# Altium PCB PROC106B_ASCII.PcbDoc (part 7 of 8)
Units mil, origin at the board's own origin, x right, y up, seen from the top; angles counter-clockwise.
Board outline 4498.18 x 1060.53 mil, 8 copper layers (Top Layer, GND1, Sig1, PWR1, PWR2, Sig2, GND2, Bottom Layer), stack 69.602 mil thick; 439 components, 327 nets, 1548 pads, 843 vias.
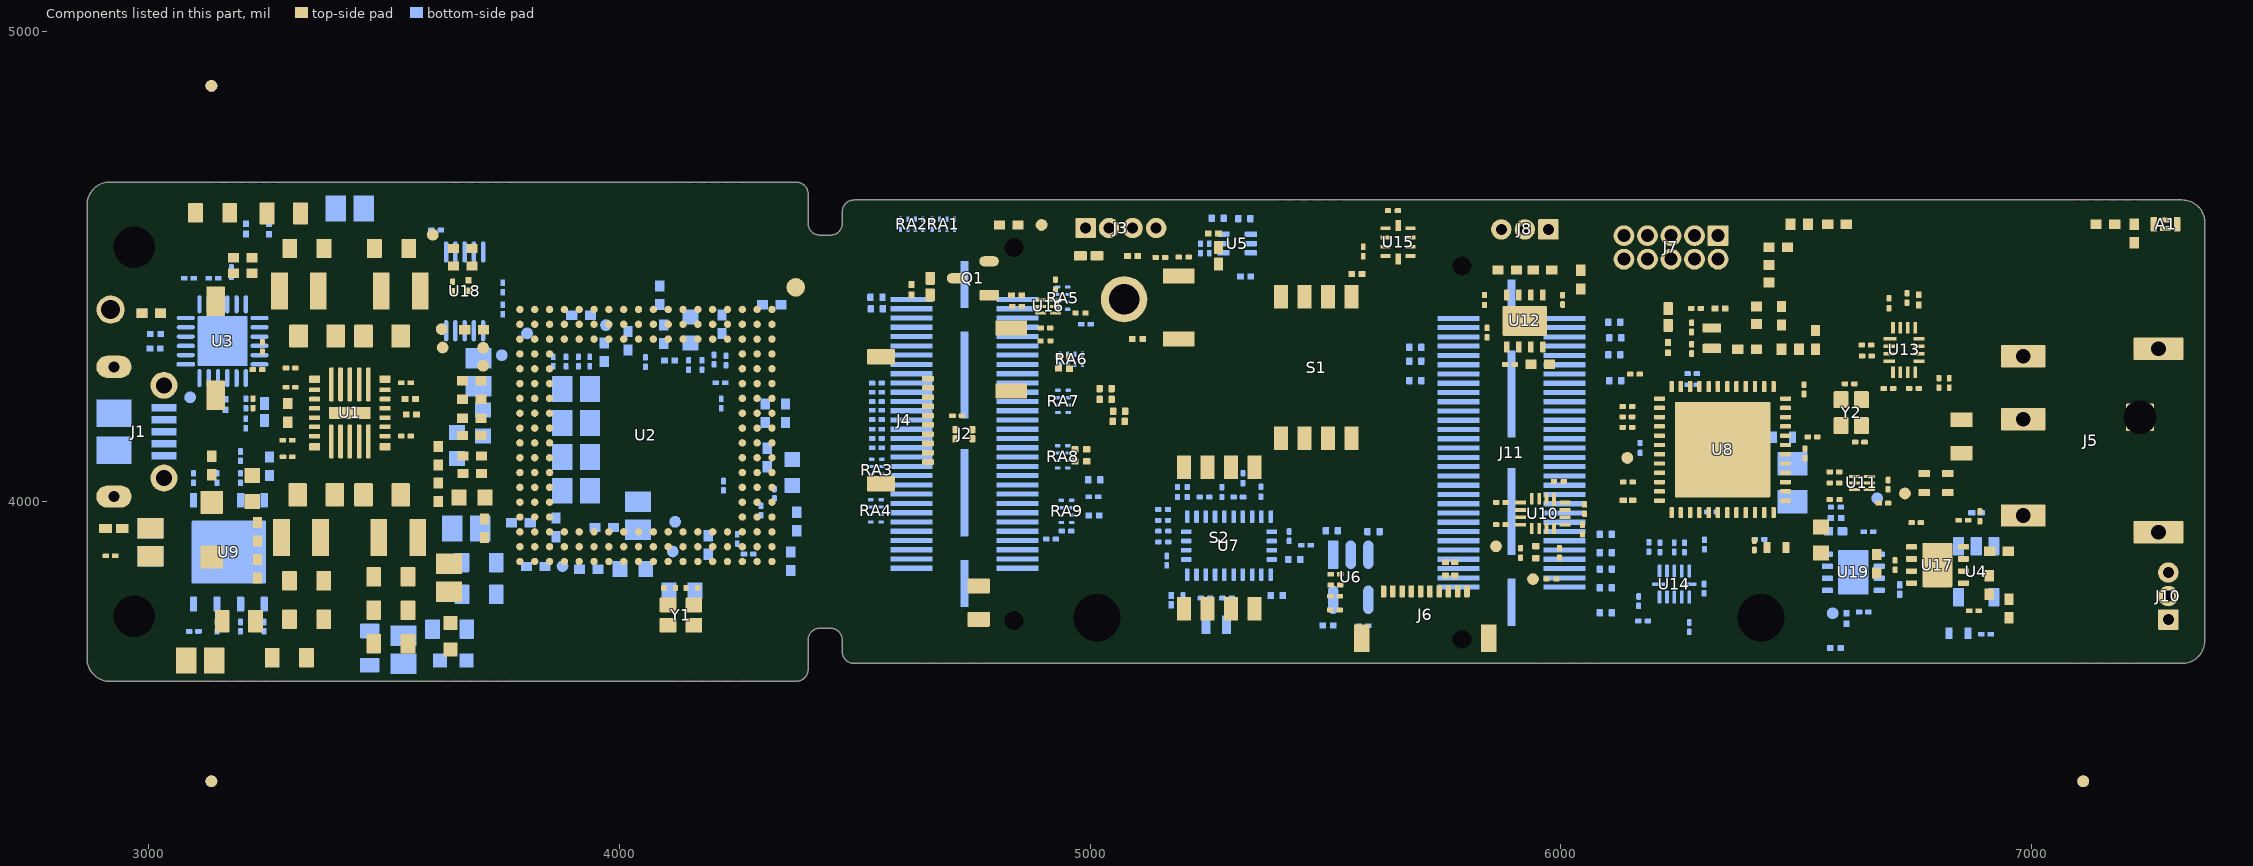
[diagram p13: the components of this part, seen from the top]

## Polygon pours and split planes (outlines as drawn) (continued)
GND on Bottom Layer "Bottom Layer-GND 3" (solid, remove dead copper, pour order 760): 3437.8,4669.84 3522.45,4669.84 3522.45,4586.72 3437.8,4586.72
GND on Bottom Layer "Bottom Layer-GND 5" (solid, remove dead copper, pour order 756): 3589.51,3885.19 3589.51,3816.34 3622.06,3783.79 3660.04,3745.8 3660.04,3708.73 3691.76,3708.73 3691.76,3893.86 3678.45,3907.17 3611.49,3907.17
GND on Bottom Layer "Bottom Layer-GND 2" (solid, remove dead copper, pour order 748): 3921.61,4124.36 3995.34,4124.36 3995.34,3981.19 3921.61,3981.19
AR_1P2 on Bottom Layer "Bottom Layer-AR_1P2" (solid, remove dead copper, pour order 742): 3283.69,4679.43 3417.05,4679.43 3417.05,4582.18 3283.69,4582.18
5V_IN on Bottom Layer "Bottom Layer-5V_IN" (solid, remove dead copper, pour order 721): 2969.58,3908.01 3085.96,3908.01 3085.96,3827.52 2969.58,3827.52
PMIC_1V0 on Bottom Layer "Bottom Layer-PMIC_1V0" (solid, remove dead copper, pour order 719): 3710.58,3701.2 3698.85,3689.47 3661.67,3689.47 3661.67,3629.17 3763.64,3629.17 3763.64,3701.2
no net on Bottom Layer "BOTTOM-No Net 1" (solid, remove dead copper, pour order 709): 3713.85,4118.01
no net on Bottom Layer "BOTTOM-No Net" (solid, pour order 707): 3795.02,4389.29
no net on Bottom Layer " " (solid, remove dead copper, pour order 705): 3587.57,4370.79
no net on Bottom Layer " " (solid, remove dead copper, pour order 703): 3587.57,4370.79
AR_1V8 on Bottom Layer "Bottom Layer-BB_1V8" (solid, remove dead copper, pour order 701): 3903.37,4272.45 3852.76,4272.45 3665,4272.45 3665,4219.16 3815.53,4219.16 3824.69,4210 3903.37,4210
AR_1V8 on Bottom Layer "BOTTOM-VCO_1V8" (solid, remove dead copper, pour order 697): 3975,3962.68 4012.22,3962.68 4071,3962.68 4071,3910.88 3975,3910.88
AR_1P0_RF1 on Bottom Layer "Bottom Layer-AR_1P0_RF1" (solid, remove dead copper, pour order 695): 3856.3,4159.48 3856.3,4197.12 3899.77,4197.12 3900.11,4131.96 3794.33,4131.96 3774.34,4131.96 3764.92,4122.55 3691.55,4122.54 3691.55,4159.48
AR_1V8 on Bottom Layer "BOTTOM-VCLK_1V8" (solid, remove dead copper, pour order 691): 3679.79,3911.04 3910.06,3911.04 3910.06,3943.24 3783.91,3943.24 3783.91,3983.65 3679.79,3983.65
no net on Bottom Layer "Bottom Layer-No Net" (solid, pour order 683): 3057.31,4083.94
PMIC_3V3 on Bottom Layer "Bottom Layer-PMIC_3V3" (solid, remove dead copper, pour order 681): 3004.01,4452.9 3113.51,4452.9 3113.51,4399.78 3109.47,4395.73 3102.51,4395.73 3097.94,4391.16 3097.94,4365.53 3051.98,4365.53 3033.61,4383.9 3004.01,4383.9
AR_1P0_RF1 on Bottom Layer "Bottom Layer-AR_1P0_RF1 1" (solid, remove dead copper, pour order 679): 3715.91,3777.88 3715.91,3726.32 3794.09,3726.32 3794.09,3828.85 3780.86,3842.09 3780.86,3896.41 3715.91,3896.41
5V_HD_IN on Bottom Layer "Bottom Layer-5V_HD_IN 1" (solid, pour order 557): 6641.93,3812.08 6641.93,3696.21 6707.53,3696.21 6707.53,3812.08 6702.57,3812.08 6659.82,3812.08 6662.84,3812.08
5V_HD_IN on Bottom Layer "Bottom Layer-5V_HD_IN 3" (solid, pour order 563): 4868.09,3859.51
5V_IN_B on Bottom Layer "Bottom Layer-5V_IN_B" (solid, pour order 521): 6653.01,3852.6 6759.98,3852.6 6759.98,4006.83 6775.86,4022.71 6798.1,4022.71 6798.1,4150.17 6690.11,4150.17 6690.11,4110.05 6690.85,4109.3 6690.85,4101.69 6690.85,4075.96 6690.86,4067.7 6655.23,4032.07 6655.23,3923.83 6657.56,3921.5 6658.81,3920.25 6675.91,3903.15 6685.85,3893.21 6685.75,3876.47 6681.98,3872.7 6653.01,3872.7
RE on Bottom Layer "Bottom Layer-RE" (solid, remove dead copper, pour order 505): 7331.54,4438.37 7307.92,4438.37 7307.92,4627.35 7331.54,4627.35
5V_IN on Bottom Layer "BOTTOM-5V_IN_SW" (solid, pour order 318): 6716.51,3843.31 6664.37,3843.31 6664.37,3827.48 6697.27,3827.48 6706.84,3817.91 6713.65,3817.91 6727.01,3817.91 6727.01,3728.16 6799.26,3728.16 6826.37,3755.28 6826.37,3800.18 6821.37,3805.18 6801.37,3805.18 6782.49,3805.18 6777.74,3809.92 6777.74,3842.18 6773.37,3846.18 6719.37,3846.18
no net on Bottom Layer " " (solid, remove dead copper, pour order 459): 4514.15,4464.37
no net on Bottom Layer "BOTTOM-No Net 3" (solid, pour order 266): 4918.91,3816.49
no net on Bottom Layer "BOTTOM-No Net 4" (solid, pour order 264): 4983.76,3878.78
AR_1P0_RF1 on PWR1 "PWR1-AR_1P0_RF1" (solid, remove dead copper, pour order 725): 3696.4,3846.98 3714.8,3828.66 3783.45,3828.66 3783.45,3726.14 3520.23,3726.14 3520.23,3982.24 3689.65,4151.66 3872.58,4151.66 3872.58,4038.59 3731.51,4038.59 3696.4,4003.44
AR_1P2 on PWR1 "PWR1-AR_1P2" (solid, remove dead copper, pour order 731): 4383.81,4173.3 4383.81,4319.42 4383.81,4679.43 3769.2,4679.43 3254.72,4679.43 3254.72,4485.55 3606.66,4485.55 3606.66,4349.35 3935.57,4349.35 3935.57,4419.55 4276.95,4419.55 4302.94,4393.56 4302.94,4179.48 4325.05,4157.06 4325.05,4115.19 4335.64,4104.6 4335.64,3889.16 4152.76,3889.16 4152.76,3822.45 4383.81,3822.45 4383.81,4093.23
AR_1V8 on PWR1 "PWR1-AR_1V8" (solid, remove dead copper, pour order 723): 4317.82,4156.75 4296.2,4178.37 4296.2,4372.39 4266.03,4403.13 3952.06,4403.13 3910.52,4361.6 3660.28,4361.6 3593.74,4295.06 3322.56,4294.82 3322.56,3824.21 3281.64,3783.2 3142.74,3783.2 3142.74,3618.01 3500.96,3618.01 3500.96,3997.33 3676.25,4172.62 3923.29,4172.62 3923.29,4273.48 4199.1,4273.48 4199.1,4021.86 4199.1,4020.83 4184.31,4005.54 3744.04,4005.54 3729.16,3990.66 3729.26,3874.14 3749.49,3853.9 3750.27,3853.73 3989.56,3853.73 4046.2,3910.37 4317.82,3910.37
PMIC_1V0 on PWR1 "PWR1-PMIC_1V0" (solid, remove dead copper, pour order 864): 3679.96,3619.99 3679.96,3702.53 3774.68,3702.53 3774.68,3619.99
5V_IN on PWR1 "PWR1-5V_IN 1" (solid, remove dead copper, pour order 804): 6141.87,4641.38 7225.46,4641.38 7225.46,4357.95 7367.49,4358.05 7367.49,3676.33 6736.31,3676.33 6736.31,3926.82 6479.48,4183.28 5319.35,4183.28 4687.15,4183.28 4621.42,4117.56 4621.33,3669.11 4525.19,3669.11 4484.07,3669.11 4484.07,3849.59 4504.63,3849.59 4525.19,3864.58 4525.19,4641.38 5562.04,4641.38
5V_HD_IN on PWR1 "PWR1-5V_HD_IN" (solid, remove dead copper, pour order 366): 4635.53,4107.41 4635.53,3657.14 4801.12,3657.14 6712,3657.14 6712,3928.7 6480.61,4160.09 4688.21,4160.09
GND on PWR1 "PWR1-GND" (solid, remove dead copper, pour order 820): 3962.57,4259.22 3962.51,4259.86 4180.36,4259.86 4180.36,4031.23 3955.54,4031.23 3955.54,4259.22
5V_IN on PWR1 "PWR1-5V_IN" (solid, remove dead copper, pour order 734): 3300,3843.45 3252.31,3795.76 3252.31,3795.43 3073.61,3795.43 3073.61,3588.77 2869.58,3588.77 2869.58,4710.9 3245.35,4710.9 3245.35,4475.15 3587.25,4475.15 3587.25,4312.5 3300,4312.5
no net on PWR1 "L4 PWR/GND-No Net" (solid, pour order 380): 3990.62,4017.94
GND on Sig1 "      " (solid, remove dead copper, pour order 850): 2828.55,3502.51 4359.83,3502.51 4359.83,3540.49 7326.73,3540.49 7326.73,4241.62 7189.18,4241.62 7189.18,4455.67 7189.2,4491.21 7189.18,4525 4359.83,4525 4359.83,4563.04 2828.55,4563.04
GND on Sig1 "      " (solid, pour order 848): 7230.23,4607.59
3V0 on Sig1 "Sig1-3V0" (solid, remove dead copper, pour order 422): 5446.44,3648.08 5446.44,3740.77 5595.34,3889.68 5748.5,3889.68 5802.08,3836.09 5802.08,3784.14 5860.53,3725.69 6169.64,3725.69 6235.53,3789.89 6235.53,3854.82 6235.53,3991.13 6627.54,3991.13 6738.96,3879.71 6738.96,3854.82 6817.4,3854.82 6844.28,3827.94 6844.28,3688.85 6676.2,3688.85 6676.2,3872.61 6372.91,3872.61 6372.91,3648.08
no net on Sig1 "Sig1-No Net" (solid, remove dead copper, pour order 740): 4088.43,4371.99
no net on Sig1 "L3 SIG 1-No Net" (solid, pour order 511): 3904.98,4012.92
GND on GND1 "GND1-GND" (solid, remove dead copper, pour order 358): 4400.86,4641.38 4400.86,4683.33 2896.63,4683.34 2866.42,4653.12 2866.42,3646.93 2901.93,3611.42 2908,3617.49 4400.86,3617.49 4400.86,3656.87 7367.49,3656.87 7367.49,4358 7230.09,4358 7230.25,4641.38
no net on GND1 "L6 SIG 2-No Net" (solid, pour order 302): 4825.92,3926.28
no net on GND1 "DVDD_21MP_1V8_L08_P-001" (solid, remove dead copper, pour order 300): 3885.7,4301.32
PMIC_3V3 on PWR2 "PWR2-PMIC_3V3" (solid, remove dead copper, pour order 487): 4615.73,4308.97 4816.08,4509.31 4816.08,4512.23 4816.08,4631.43 4498.89,4631.43 4400.86,4631.43 4400.86,4710.69 2869.58,4710.9 2869.58,3586.35 4376.76,3586.35 4376.76,3820.05 4376.76,4308.97 4415.39,4308.97
VCC_BA_3V3 on PWR2 "PWR2-VCC_BA_3V3" (solid, remove dead copper, pour order 738): 4794.48,4263.72 4759.59,4298.61 4759.59,4414.21 4838.48,4493.1 4838.48,4641.38 7229.32,4641.38 7229.31,4358 7367.49,4358 7367.49,3657.14 4794.48,3657.14
5V_IN on PWR2 " " (solid, remove dead copper, pour order 485): 3880.16,4286.09 3848.77,4254.7 3706.1,4254.7 3706.1,4223.31 3664.77,4181.97 3492.6,4181.97 3492.6,4313.97 3583.8,4313.97 3584.11,4493.43 3259.65,4493.43 3259.65,3889.51 4016.31,3889.51 4108.84,3982.04 4306.6,3982.03 4322,3966.64 4322,3920.77 4353.26,3889.51 4413.43,3889.51 4439.46,3863.48 4453.67,3863 4483.91,3863 4485.31,3861.61 4485.31,3661.8 4490.12,3656.98 4514.15,3656.87 4748.59,3656.87 4748.59,3887.85 4748.59,4286.09
VDDS on PWR2 "PWR2-VDDS" (solid, remove dead copper, pour order 404): 6492.17,3939.96 6492.17,4039.29 6539.41,4086.52 6582.96,4086.52 6582.96,4179.9 6582.31,4179.25 6460.14,4179.25 6427.22,4212.17 6283.81,4212.17 6200.92,4295.06 6134.69,4295.06 6134.69,4010.53 6208.12,3939.96
no net on PWR2 " " (solid, remove dead copper, pour order 406): 3419.66,3877.85
no net on Bottom Solder (solid): 4400.86,4518.08 3736.09,4518.08 3736.09,4678.67 4400.86,4678.67
no net on Bottom Solder (solid): 3815.62,3618.33 3815.62,3780.33 4400.86,3780.33 4400.86,3634.41 4384.78,3618.33
no net on Bottom Solder (solid): 4189.03,4266.74 4189.03,4031.3 4008.5,4031.3 4008.5,4266.74
no net on Bottom Solder " " (solid, remove dead copper): 4514.15,4464.37
no net on Bottom Solder " " (solid, remove dead copper): 4512,4464.37
no net on M1 Board Outline " " (solid, remove dead copper): 3143.52,4361.87
no net on M1 Board Outline " " (solid, remove dead copper): 3145.55,4361.06
no net on Top Paste " " (solid): 4029.26,4016.78 3910.77,4016.78 3910.77,4130.21 4029.26,4130.21
no net on Top Paste " " (solid): 4169.12,4155.98 4050.63,4155.98 4050.63,4269.41 4169.12,4269.41
no net on Top Paste " " (solid): 4169.12,4016.78 4050.63,4016.78 4050.63,4130.21 4169.12,4130.21
no net on Top Paste " " (solid): 4029.26,4155.98 3910.77,4155.98 3910.77,4269.41 4029.26,4269.41
no net on Top Solder " " (solid): 4169.12,4016.78 4050.63,4016.78 4050.63,4130.21 4169.12,4130.21
no net on Top Solder " " (solid): 4169.12,4155.98 4050.63,4155.98 4050.63,4269.41 4169.12,4269.41
no net on Top Solder " " (solid): 4029.26,4016.78 3910.77,4016.78 3910.77,4130.21 4029.26,4130.21
no net on Top Solder " " (solid): 4029.26,4155.98 3910.77,4155.98 3910.77,4269.41 4029.26,4269.41
GND on GND2 "GND 3-GND" (solid, remove dead copper, pour order 310): 4438.86,3618.9 7367.49,3614.6 7367.49,4358 7230.24,4358 7230.24,4686.41 4522.77,4686.41 2869.56,4686.41 2869.85,3618.9
GND on Sig2 "      " (solid, remove dead copper, pour order 854): 2869.58,3618.9 4400.86,3618.9 4400.86,3656.87 4400.86,3731.52 4473.63,3731.52 4473.63,3657.18 4474.07,3656.87 7367.49,3656.87 7367.49,4358 7228.97,4358 7228.97,4572.06 7228.97,4607.59 7228.97,4641.38 4400.86,4641.38 4400.86,4679.43 2869.58,4679.43

## Keep-outs
Bottom Layer:
  rectangle: 3813.97,3824.21 4076.76,3834.25
Keep-Out Layer:
  circle w1: c5014.62,3754.06 r118.11
  circle w1: c6425.96,3754.06 r118.11
  text ".Layer_Name" at 577,-858.49 h60

## Other copper
Top Layer:
  text ".Layer_Name" at 577,-858.49 h60
GND1:
  text ".Layer_Name" at 577,-858.49 h60
Sig1:
  text ".Layer_Name" at 577,-858.49 h60
PWR1:
  text ".Layer_Name" at 577,-858.49 h60
PWR2:
  text ".Layer_Name" at 577,-858.49 h60
Sig2:
  text ".Layer_Name" at 577,-858.49 h60
GND2:
  text ".Layer_Name" at 577,-858.49 h60
Bottom Layer:
  text ".Layer_Name" at 577,-858.49 h60

## Silkscreen, mask and mechanical layers (free items; w line width, h text height)
Top Overlay:
  drawing of 931 lines, arcs and shapes, not listed
  text "ANT" at 7247.11,4618.46 h15
  text "3V3" at 4971.03,4609.77 h15
  text "SCL" at 5026.44,4609.1 h15
  text "SDA" at 5075.13,4609.42 h15
  text "GND" at 5132,4609 h15
  text "CAN1" at 5705.55,4605.09 h15
  text "3V3" at 3575.93,4600.61 h15
  text "CAN_L" at 6013.93,4563.4 h15
  text "CAN_H" at 5772.29,4557.35 h15
  text "GND" at 5902.73,4526.81 h15
  text "60PIN" at 5461.3,4505.87 h15 r90
  text "60PIN/BT" at 5407.96,4487.66 h15 r90
  text "3V3" at 4942.95,4473.45 h15
  text "LED" at 4995.38,4473.19 h15
  text "BT_JTAG_HDR" at 6201.8,4466.71 h15
  text "USR_LED" at 5256.55,4450.34 h13
  text "PROC106B" at 6836.63,4404.24 h25
  text "RST_LED" at 4614,4391 h15
  text "REV. B" at 6899.9,4369.83 h25
  text "GND" at 5054.02,4359.61 h15
  text "GND" at 2907.55,4353.02 h15
  text "BT_LED" at 6186.99,4348.24 h15 r90
  text "S3" at 3013.35,4323.17 h25
  text "USR_SW" at 5152.14,4301.5 h15
  text "SOP2" at 2999.29,4296.66 h15
  text "RST_SW" at 4794.22,4190.93 h15
  text "CAN" at 5202.96,4125.61 h15 r90
  text "60PIN" at 5257.16,4116.94 h15 r90
  text "BT_EN" at 5300.52,4106.1 h15 r90
  text "PROC106B" at 2866.22,4100.51 h25
  text "REV. B" at 2897.63,4071.86 h25
  text "BT" at 5464.69,4051.28 h15 r90
  text "SOP0" at 5511.87,4024.99 h15 r90
  text "SOP1" at 5563.64,4022.15 h15 r90
  text "CP2105" at 5431.33,4007.09 h15 r90
  text "5V_LED" at 2974.55,3984.77 h15
  text "LCD_DISP2" at 4737,3978 h15 r90
  text "5V, 2A" at 7023.94,3880.64 h25
  text "CAN_H" at 7195.3,3876.22 h15
  text "LCD_DISP1" at 5564.31,3865.44 h15
  text "GND" at 7243.19,3786.08 h15 r90
  text "CAN2" at 7119,3761 h25
  text "CAN_L" at 7189,3721 h15
  text "BT_DIS" at 5331.39,3700.83 h15
  text "BT/LCD" at 5214.43,3697.87 h15
  text "SPI" at 5198.89,3696.39 h15 r90
  text ".Layer_Name" at 557.88,-855.15 h60
Bottom Overlay:
  lines w6: 3076.75,4275.09 3064.53,4275.09 3077.44,4262.17 3077.44,4274.39 ; 3742.27,4351.32 3750.91,4342.68 3750.91,4360.94 3742.27,4352.3 ; 4566.51,3859.44 4557.87,3850.8 4557.87,3869.06 4566.51,3860.42 ; 5190.34,3835.05 5178.12,3835.05 5191.04,3822.14 5191.04,3834.36 ; 5366.68,4568.32 5375.32,4559.68 5375.32,4577.94 5366.68,4569.3 ; 5498.49,3885.48 5489.85,3876.84 5489.85,3895.1 5498.49,3886.46 ; 6061.18,4387.35 6069.82,4378.71 6069.82,4396.98 6061.18,4388.34 ; 6286.44,3772.48 6277.8,3763.84 6296.07,3763.84 6287.43,3772.48 ; 6545.92,3811.92 6537.28,3803.28 6537.28,3821.55 6545.92,3812.91 ; 6822.27,3908.34 6813.62,3899.69 6813.62,3917.96 6822.27,3909.32
  lines w7.64: 3376.95,4259.36 3435.38,4360.56 3493.81,4259.36 3376.95,4259.36
  text "S/N:" at 7054.26,4555.33 h40
  text "J11" at 5720.69,4441.63 h25
  text "OPN:" at 7053.04,4398.05 h40
  text "For evaluation only;" at 6904.33,4270.31 h30
  text "not FCC approved for resale." at 6905.33,4220.31 h30
  text "USB_LED" at 3294.77,4133.76 h15 r270
  text "ICBOOST_CONN" at 5046.93,4070.06 h25 r270
  text "DCA_CONN" at 5658.79,4014.25 h25 r270
  text "USB1" at 2938.13,3956.53 h15
  text "U14" at 6365,3859 h25
  text ".Layer_Name" at 577,-858.49 h60
Top Paste:
  text ".Layer_Name" at 577,-858.49 h60
Bottom Paste:
  text ".Layer_Name" at 577,-858.49 h60
Top Solder:
  text ".Layer_Name" at 577,-858.49 h60
  text ".Layer_Name" at 577,-858.49 h60
Bottom Solder:
  text ".Layer_Name" at 577,-858.49 h60
Drill Guide:
  text ".Layer_Name" at 577,-858.49 h60
M1 Board Outline:
  lines w1: 2917.58,3586.87 2917.58,3586.87
  lines w6: 3043.52,4771.95 2893.99,4771.95 ; 4408.74,4993.07 7334.57,4993.07 ; 5242.82,4819.03 cw(c5242.82,4776.51) 5285.34,4776.51 ccw(c5327.85,4776.51) 5327.85,4734 5349.85,4734 ; 5242.82,4819.16 4924.89,4819.16 ccw(c4924.89,4776.65) 4882.38,4776.65 cw(c4839.86,4776.65) 4839.86,4734.13 4405.8,4734.13 cw(c4405.8,4743.59) 4396.34,4743.59 4396.34,4758.92 ccw(c4383.31,4758.92) 4383.31,4771.95 2893.99,4771.95 ; 5631,4734 5670.37,4734 ccw(c5670.37,4776.51) 5712.88,4776.51 cw(c5755.4,4776.51) 5755.4,4819.03 cw(c5755.57,4819.03) 5755.57,4819.2 6393.01,4819.2 cw(c6393.01,4776.68) 6435.53,4776.68 ccw(c6478.04,4776.68) 6478.04,4734.17 ; 6478.04,4733.95 7319.76,4733.95 ccw(c7319.57,4733.95) 7319.57,4734.13 7320.05,4734.13 ; 6824.41,4993.07 2895.02,4993.07 ccw(c2895.02,4967.63) 2869.59,4967.63 2869.59,4796.35 ccw(c2893.99,4796.35) 2893.99,4771.95 ; 7317.76,4993.07 cw(c7317.76,4943.07) 7367.76,4943.07 7367.76,4781.58 cw(c7320.31,4781.58) 7320.31,4734.13 ; 7320.59,3563.53 4607.03,3563.53 4428.96,3563.53 ccw(c4428.96,3550.55) 4415.97,3550.55 4415.97,3537.53 cw(c4404.81,3537.53) 4404.81,3526.38 3043.52,3526.38 2923.72,3526.38 2907.56,3526.38 ccw(c2907.56,3488.4) 2869.58,3488.4 2869.58,3349.31 ccw(c2912.09,3349.31) 2912.09,3306.8 6841.48,3306.8 7329.95,3306.8 ccw(c7329.95,3343.5) 7366.66,3343.5 ; 7321.69,3563.53 cw(c7321.69,3517.44) 7367.79,3517.44 ; 7367.76,3343.5 7367.76,3517.41
  lines w10: 2869.58,3666.9 ccw(c2917.58,3666.9) 2917.58,3618.9 ; 2869.58,3666.9 ccw(c2917.58,3666.9) 2917.58,3618.9 ; 2869.58,3666.9 2869.58,4631.43 ; 2869.58,3666.9 2869.58,4631.43 ; 2869.58,4631.43 cw(c2917.58,4631.43) 2917.58,4679.43 ; 2869.58,4631.43 cw(c2917.58,4631.43) 2917.58,4679.43 ; 2917.58,3618.9 4375.86,3618.9 2917.58,3618.9 ; 2917.58,4679.43 4375.28,4679.43 2917.58,4679.43 ; 4400.86,3644 cw(c4375.86,3644) 4375.86,3619 ccw(c4375.86,3644) 4400.86,3644 ; 4400.86,3644 4400.86,3706.52 ; 4400.86,3644 4400.86,3706.52 ; 4400.86,3706.52 cw(c4425.86,3706.52) 4425.86,3731.52 ; 4400.86,3706.52 cw(c4425.86,3706.52) 4425.86,3731.52 ; 4400.86,3876.17 ccw(c4425.86,3876.17) 4425.86,3851.17 ; 4400.86,3876.17 ccw(c4425.86,3876.17) 4425.86,3851.17 ; 4400.86,3876.17 4400.86,3900.82 ; 4400.86,3876.17 4400.86,3900.82 ; 4400.86,3900.82 cw(c4425.86,3900.82) 4425.86,3925.82 ; 4400.86,3900.82 cw(c4425.86,3900.82) 4425.86,3925.82 ; 4400.86,4136.81 ccw(c4425.86,4136.81) 4425.86,4111.81 ; 4400.86,4136.81 ccw(c4425.86,4136.81) 4425.86,4111.81 ; 4400.86,4136.81 4400.86,4161.47 ; 4400.86,4136.81 4400.86,4161.47 ; 4400.86,4161.47 cw(c4425.86,4161.47) 4425.86,4186.47 ; 4400.86,4161.47 cw(c4425.86,4161.47) 4425.86,4186.47 ; 4400.86,4397.47 ccw(c4425.86,4397.47) 4425.86,4372.47 ; 4400.86,4397.47 ccw(c4425.86,4397.47) 4425.86,4372.47 ; 4400.86,4397.47 4400.86,4422.12 ; 4400.86,4397.47 4400.86,4422.12 ; 4400.86,4422.12 cw(c4425.86,4422.12) 4425.86,4447.12 ; 4400.86,4422.12 cw(c4425.86,4422.12) 4425.86,4447.12 ; 4400.86,4591.77 ccw(c4425.86,4591.77) 4425.86,4566.77 ; 4400.86,4591.77 ccw(c4425.86,4591.77) 4425.86,4566.77 ; 4400.86,4591.77 4400.86,4654.3 ; 4400.86,4591.77 4400.86,4654.3 ; 4400.86,4654.3 ccw(c4375.86,4654.3) 4375.86,4679.3 cw(c4375.86,4654.3) 4400.86,4654.3 ; 4425.86,3731.52 4448.63,3731.52 ; 4425.86,3731.52 4448.63,3731.52 ; 4425.86,3851.17 4448.63,3851.17 ; 4425.86,3851.17 4448.63,3851.17 ; 4425.86,3925.82 4448.63,3925.82 ; 4425.86,3925.82 4448.63,3925.82 ; 4425.86,4111.81 4448.63,4111.81 ; 4425.86,4111.81 4448.63,4111.81 ; 4425.86,4186.47 4448.63,4186.47 ; 4425.86,4186.47 4448.63,4186.47 ; 4425.86,4372.47 4448.63,4372.47 ; 4425.86,4372.47 4448.63,4372.47 ; 4425.86,4447.12 4448.63,4447.12 ; 4425.86,4447.12 4448.63,4447.12 ; 4425.86,4566.77 4448.63,4566.77 ; 4425.86,4566.77 4448.63,4566.77 ; 4448.63,3731.52 cw(c4448.63,3706.52) 4473.63,3706.52 ; 4448.63,3731.52 cw(c4448.63,3706.52) 4473.63,3706.52 ; 4448.63,3851.17 ccw(c4448.63,3876.17) 4473.63,3876.17 ; 4448.63,3851.17 ccw(c4448.63,3876.17) 4473.63,3876.17 ; 4448.63,3925.82 cw(c4448.63,3900.82) 4473.63,3900.82 ; 4448.63,3925.82 cw(c4448.63,3900.82) 4473.63,3900.82 ; 4448.63,4111.81 ccw(c4448.63,4136.81) 4473.63,4136.81 ; 4448.63,4111.81 ccw(c4448.63,4136.81) 4473.63,4136.81 ; 4448.63,4186.47 cw(c4448.63,4161.47) 4473.63,4161.47 ; 4448.63,4186.47 cw(c4448.63,4161.47) 4473.63,4161.47 ; 4448.63,4372.47 ccw(c4448.63,4397.47) 4473.63,4397.47 ; 4448.63,4372.47 ccw(c4448.63,4397.47) 4473.63,4397.47 ; 4448.63,4447.12 cw(c4448.63,4422.12) 4473.63,4422.12 ; 4448.63,4447.12 cw(c4448.63,4422.12) 4473.63,4422.12 ; 4448.63,4566.77 ccw(c4448.63,4591.77) 4473.63,4591.77 ; 4448.63,4566.77 ccw(c4448.63,4591.77) 4473.63,4591.77 ; 4473.47,4616.39 cw(c4498.47,4616.39) 4498.47,4641.39 ccw(c4498.47,4616.39) 4473.47,4616.39 ; 4473.47,4616.39 4473.63,4591.77 ; 4473.47,4616.39 4473.63,4591.77 ; 4473.63,3706.52 4473.63,3681.91 4473.63,3706.52 ; 4473.63,3876.17 4473.63,3900.82 ; 4473.63,3876.17 4473.63,3900.82 ; 4473.63,4136.81 4473.63,4161.47 ; 4473.63,4136.81 4473.63,4161.47 ; 4473.63,4397.47 4473.63,4422.12 ; 4473.63,4397.47 4473.63,4422.12 ; 7319.76,4641.43 cw(c7319.76,4593.44) 7367.75,4593.44 ; 7319.76,4641.43 cw(c7319.76,4593.44) 7367.75,4593.44 ; 7319.76,4641.43 4498.47,4641.43 7319.76,4641.43 ; 7367.76,3704.87 cw(c7319.76,3704.87) 7319.76,3656.87 ccw(c7319.76,3704.87) 7367.76,3704.87 ; 7367.76,3704.87 7367.76,4593.44 ; 7367.76,3704.87 7367.76,4593.44 ; 7367.75,4593.44 7367.76,4593.44 ; 7367.75,4593.44 7367.76,4593.44 ; 4473.47,3681.91 ccw(c4498.47,3681.91) 4498.47,3656.91 cw(c4498.47,3681.91) 4473.47,3681.91 ; 4498.47,3656.87 7319.49,3656.87 4498.47,3656.87
  text "M1 Board Outline" at 577,-858.49 h60
M2 Board Dimensions:
  text "X3" at 4305,3996 h60 r90
  text "X3" at 4837,3440 h60
  text "M2 Board Dimensions" at 577,-858.49 h60
M3 3D STEP Top:
  text ".Layer_Name" at 577,-858.49 h60
M4 3D STEP Bottom:
  text ".Layer_Name" at 577,-858.49 h60
M5 Assembly Top:
  lines w2: 3900.18,4006.48 3900.18,4279.71 4179.71,4279.71 4179.71,4006.48 3900.18,4006.48
  lines w6: 3737.37,3862.55 3745.19,3854.73 3745.92,3854.73 ; 3745.92,4221.46 3745.92,3854.73 ; 3752.8,3861.61 3745.92,3854.73 ; 4662.01,4263.83 4670.65,4255.19 4670.65,4273.46 4662.01,4264.82 4662.01,4263.83 ; 4783.42,4428.97 4783.42,4429.96 4792.06,4438.6 4792.06,4420.33 4783.42,4428.97 ; 4938.22,4398.63 4938.22,4399.62 4946.86,4408.26 4946.86,4389.99 4938.22,4398.63 ; 5551.38,3777.7 5560.02,3786.34 5560.02,3787.32 5551.38,3795.97 5551.38,3777.7 ; 5966.42,4578.64 5975.06,4587.28 5976.04,4587.28 5984.68,4578.64 5966.42,4578.64 ; 6328.53,4574.58 6337.17,4583.22 6338.16,4583.22 6346.8,4574.58 6328.53,4574.58 ; 7291.94,3711.22 7291.94,3729.48 7300.58,3720.84 7300.58,3719.86 7291.94,3711.22
  lines w10: -287.5,-917.17 6312.5,-917.17 ; -287.5,-713.83 6314.5,-713.83 ; -287.5,-510.5 -287.5,-1120.5 3717.5,-1120.5 6314.5,-1120.5 6314.5,-510.5 -287,-510.5 -287,-1120.5 1288.5,-1120.5 ; 2177.5,-1120.5 2177.5,-510.5 ; 3444.5,-713.83 3444.5,-510.5 ; 4284.5,-713.83 4284.5,-510.5 ; 4906.5,-1127 4906.5,-924.17
  text "COMPONENTS MARKED 'DNP' SHOULD NOT BE POPULATED." at -159.85,-299.74 h60
  text "ASSEMBLY VARIANT:" at -160.35,-415.24 h60
  text ".VariantName" at 875.65,-415.24 h60
  text "PCB VIEWED FROM TOP SIDE" at -228.5,-655.67 h60
  text "BOARD #:" at 2248,-655.67 h60
  text ".PRJ_Number" at 2793.5,-655.67 h60
  text "REV:" at 3638,-655.67 h60
  text ".PCB_Rev" at 3929.5,-655.67 h60
  text "SVN REV:" at 4476,-655.67 h60
  text ".VersionControl_RevNumber" at 4982,-655.67 h60
  text ".Layer_Name" at 538.89,-854.26 h60
  text "TID #:" at 2248,-859 h60
  text ".TID" at 2793.5,-859 h60
  text "PLOT NAME =" at -228.5,-1064.34 h60
  text ".plot_File_Name" at 577,-1064.34 h60
  text "GENERATED    :" at 2250,-1064.34 h60
  text ".Print_Date" at 3119.5,-1064.34 h60
  text ".Print_Time" at 3848.5,-1064.34 h60
  text "TEXAS INSTRUMENTS" at 5113,-1064.34 h60
M6 Assembly Bottom:
  lines w6: 3051.59,4095.56 3060.23,4086.92 3060.23,4105.18 3051.59,4096.54 ; 3056.52,4289.78 3047.88,4281.14 3047.88,4299.4 3056.52,4290.76 ; 4556.9,3856.76 4548.26,3848.12 4548.26,3866.39 4556.9,3857.74 ; 6054.41,4389.59 6063.05,4380.95 6063.05,4399.22 6054.41,4390.57
  lines w10: -288,-714.33 6314,-714.33 ; -286,-917.67 6314,-917.67 ; 1120,-1127.5 1120,-924.67 ; 1742,-714.33 1742,-511 ; 2582,-714.33 2582,-511 ; 3849,-1121 3849,-511 ; 4510.26,4292.38 4510.26,4160.86 ; 4518.19,4168.91 4510.26,4160.98 4510.26,4160.86 ; 4738,-1121 6313.5,-1121 6313.5,-511 -288,-511 -288,-1121 2309,-1121 6314,-1121 6314,-511 ; 4510.26,4160.86 4501.64,4169.48 4510.26,4160.86
  text "COMPONENTS MARKED 'DNP' SHOULD NOT BE POPULATED." at 6102,-318 h60
  text ".VariantName" at 5058,-434 h60
  text "ASSEMBLY VARIANT:" at 6097,-434 h60
  text ".VersionControl_RevNumber" at 1035.5,-656.17 h60
  text "SVN REV:" at 1541.5,-656.17 h60
  text ".PCB_Rev" at 2088,-656.17 h60
  text "REV:" at 2379.5,-656.17 h60
  text ".PRJ_Number" at 3224,-656.17 h60
  text "BOARD #:" at 3769.5,-656.17 h60
  text "PCB VIEWED FROM BOTTOM SIDE" at 6246,-656.17 h60
  text ".Layer_Name" at 1514.22,-848.89 h60
  text ".TID" at 3224,-859.5 h60
  text "TID #:" at 3769.5,-859.5 h60
  text "TEXAS INSTRUMENTS" at 904.5,-1064.84 h60
  text ".Print_Time" at 2169,-1064.84 h60
  text ".Print_Date" at 2898,-1064.84 h60
  text "GENERATED    :" at 3767.5,-1064.84 h60
  text ".plot_File_Name" at 5440.5,-1064.84 h60
  text "PLOT NAME =" at 6246,-1064.84 h60
M10 Fab Notes:
  drawing of 254 lines, arcs and shapes, not listed
  text "2" at 3215,8061 h70
  text "1" at 739.84,8036.5 h70
  text "3" at 5724.84,8036.5 h70
  text "4" at 8231.51,8036.5 h70
  text "5" at 10730.5,8036.5 h70
  text "6" at 13235.5,8036.5 h70
  text "A" at -416.5,6893.5 h70
  text "A" at 14383.5,6893.5 h70
  text "DESIGN INFORMATION" at 12391.15,6364.21 h60
  text "4" at 12769.13,6238.04 h60
  text "MIN. TRACK WIDTH:" at 11746.59,6232.09 h60
  text "MIL" at 12997.59,6232.09 h60
  text "MIN. CLEARANCE:" at 11746.59,6107.96 h60
  text "4" at 12782.83,6107.96 h60
  text "MIL" at 12997.59,6107.96 h60
  text "MIN. VIA PAD SIZE:" at 11746.59,5983.83 h60
  text "18" at 12812.84,5983.84 h60
  text "MIL" at 12997.59,5983.83 h60
  text "0.05mm (2MIL)" at 12441.59,5853.93 h60
  text "MINIMUM ANNULAR RING" at 11417.36,5845.71 h60
  text "EXTERNAL" at 13149.59,5845.71 h60
  text "PER" at 11617.36,5735.58 h60
  text "IPC-D-275 CLASS 2 LEVEL C" at 11837.36,5735.58 h60
  text "MIL, HOLES" at 13325.59,5635.11 h60
  text "+/-" at 12933.13,5626.52 h60
  text "+/-" at 13787.13,5626.52 h60
  text "REGISTRATION TOLERANCES:" at 11417.36,5625.46 h60
  text "METAL" at 12617.13,5625.46 h60
  text "5" at 13193.33,5625.46 h60
  text "3" at 14026.33,5625.46 h60
  text "MIL" at 14142.59,5625.46 h60
  text "HOLE SIZE TOLERANCE (UNLESS OTHERWISE SPECIFIED):" at 11417.36,5527.14 h60
  text "+/-" at 13787.13,5524.27 h60
  text "3" at 14026.33,5523.21 h60
  text "MIL" at 14142.59,5523.2 h60
  text "MATERIAL:" at 11342.59,5385.56 h60
  text "FR-4 High Tg" at 12329.03,5257.03 h60
  text "X" at 12176.59,5254.04 h60
  text "FR-408" at 11763.59,5244.53 h60
  text "OTHER" at 13251.59,5244.53 h60
  text "74 MIL (1.86mm) +/-10%" at 12083.69,5101.5 h60
  text "X" at 11963.59,5099.04 h60
  text "THICKNESS:" at 11417.36,5093.27 h60
  text "OTHER" at 13368.59,5093.27 h60
  text "TOLERANCE:" at 11417.36,4954.96 h60
  text "X" at 12265.59,4954.96 h60
  text "ANSI IPC-6012 TYPE 3 CLASS 2" at 12443.6,4954.96 h60
  text "OTHER +/-" at 12443.59,4810.77 h60
  text "BOW & TWIST:" at 11417.36,4665.58 h60
  text "X" at 12265.59,4665.58 h60
  text "ANSI IPC-6012 TYPE 3 CLASS 2" at 12443.6,4665.58 h60
  text "OTHER +/-" at 12443.59,4518.89 h60
  text "B" at -416.5,4513.5 h70
  text "B" at 14383.5,4513.5 h70
  text "DRILLING:" at 11342.59,4388.27 h60
  text "NC_DRILL FILES" at 13103.59,4283.08 h60
  text "REFERENCE:" at 11417.36,4279.14 h60
  text "X" at 12074.59,4279.04 h60
  text "AS SHOWN" at 12252.59,4279.14 h60
  text "X" at 12975.59,4279.14 h60
  text "OTHER" at 13401.59,4136.89 h60
  text "PTH COPPER THICKNESS:" at 11417.03,4133.36 h60
  text "X" at 12556.27,4133.36 h60
  text "20-30 um" at 12684.27,4133.36 h60
  text "BOARD FINISH:" at 11342.59,3985.76 h60
  text "SILKSCREEN:" at 11497.81,3875.64 h60
  text "X" at 12455.59,3875.64 h60
  text "TOP" at 12572.59,3875.64 h60
  text "X" at 12965.59,3875.64 h60
  text "BOTTOM" at 13083.59,3875.64 h60
  text "SILKSCREEN COLOR:" at 11497.81,3720.45 h60
  text "X" at 12454.59,3720.45 h60
  text "WHITE" at 12572.59,3720.45 h60
  text "OTHER" at 13083.59,3720.45 h60
  text "X" at 12585.59,3577 h60
  text "RED" at 12703.59,3577 h60
  text "OTHER" at 13321.59,3577 h60
  text "SOLDER RESIST COLOR:" at 11497.81,3570.13 h60
  text "X" at 12585.59,3422.75 h60
  text "MATTE" at 12703.59,3422.75 h60
  text "SEMI-GLOSS" at 13321.13,3422.11 h60
  text "IMMERSION GOLD (ENIG)" at 12403.59,3249.98 h60
  text "ENEPIG" at 13741.13,3242.75 h60
  text "SURFACE FINISH:" at 11342.59,3241.75 h60
  text "X" at 12225.59,3241.75 h60
  text "IMM. TIN/SILVER OR EQUIV" at 11672.13,3104.44 h60
  text "OTHER" at 13103.59,3100.5 h60
  text "ARRAY/PANEL:" at 11342.59,2945.12 h60
  text "CUT AND TRIM PER M1 BOARD OUTLINE" at 12403.59,2936.9 h60
  text "X" at 12215,2804 h60
  text "N.C. ROUTE" at 12403.59,2800.94 h60
  text "V. SCORE" at 13269.59,2800.94 h60
  text "CERTIFICATION:" at 11342.59,2671.81 h60
  text "MATERIALS AND WORKMANSHIP FOR ALL PCBS" at 12067.59,2671.81 h60
  text "TO MEET OR EXCEED THE REQUIREMENTS OF:" at 12067.59,2577.75 h60
  text "X" at 11705.1,2449.12 h60
  text "ANSI IPC-A-600F CLASS ->" at 11833.09,2449.12 h60
  text "X" at 13481.1,2449.12 h60
  text "2" at 13591.09,2449.12 h60
  text "1" at 13276.09,2447.62 h60
  text "3" at 13945.09,2447.62 h60
  text "X" at 12517.1,2301.43 h60
  text "RoHS" at 12645.09,2301.43 h60
  text "OTHER" at 13289.49,2301.43 h60
  text "PER ORDER" at 13686.55,2301.43 h60
  text "ALL BOARDS MUST MEET OR EXCEED UL94-V0 REQUIREMENTS." at 11370.13,2147.6 h60
  text "C" at -416.5,2138.5 h70
  text "C" at 14383.5,2138.5 h70
  text "PCB MUST BEAR THE UL94V-0 UL REGISTERED MATERIAL ID NUMBER" at 11370.13,2031.54 h60
  text "ADDITIONAL REQUIREMENTS:" at 11342.59,1862.12 h60
  text "MICROSECTION:" at 11417.36,1754.99 h60
  text "YES" at 12323.09,1754.99 h60
  text "REQUIRED" at 13184.59,1610.66 h60
  text "BARE BOARD ELEC. TEST:" at 11417.36,1607.8 h60
  text "NONE" at 12723.09,1607.8 h60
  text "X" at 13066.59,1607.8 h60
  text "PER ORDER" at 13776.59,1607.8 h60
  text "IMPEDANCE SPECIFICATIONS" at 3824.73,1597.91 h82.24
  text "IMPEDANCE SPECIFICATIONS" at 3824.73,1597.91 h82.24
  text "XX MIL VIAS REQUIRE NON-CONDUCTIVE FILL AND PLANARIZE" at 11585.51,1402.85 h59
  text "SL#" at 3713.7,1310.07 h82.24
  text "SL#" at 3713.7,1310.07 h82.24
  text "TYPE" at 4852.75,1310.07 h82.24
  text "TYPE" at 4852.75,1310.07 h82.24
  text "LAYER" at 6053.48,1310.07 h82.24
  text "LAYER" at 6053.48,1310.07 h82.24
  text "TRACEWIDTH(Mils)" at 6740.2,1310.07 h82.24
  text "TRACEWIDTH(Mils)" at 6740.2,1310.07 h82.24
  text "SPACING(Mils)" at 8093.08,1310.07 h82.24
  text "SPACING(Mils)" at 8093.08,1310.07 h82.24
  text "IMPEDANCE(Ohms)" at 9240.36,1310.07 h82.24
  text "IMPEDANCE(Ohms)" at 9240.36,1310.07 h82.24
  text "REF LAYER" at 10506.88,1310.07 h82.24
  text "REF LAYER" at 10506.88,1310.07 h82.24
  text "XX MIL VIAS REQUIRE CONDUCTIVE FILL AND PLANARIZE" at 11593.51,1298.88 h60
  text "X" at 11460.14,1142.4 h60
  text "OUTER XX MIL TRACES REQUIRE 50 OHM SINGLE-ENDED IMPEDANCE" at 11592.52,1135.49 h58
  text "L02,L07" at 10662.95,1128.02 h82.24
  text "L1,L8" at 6083.27,1124.91 h82.24
  text "6.7" at 7231.18,1121.73 h82.24
  text "---" at 8485.37,1121.73 h82.24
  text "50" at 9698.44,1121.73 h82.24
  text "MICROSTRIP" at 4032.46,1112.2 h82.24
  text "01" at 3746.6,1104.46 h82.24
  text "01" at 3746.6,1104.46 h82.24
  text "L07" at 10663.5,988.62 h82.24
  text "5" at 8544.58,985.21 h82.24
  text "L8" at 6083.27,980.99 h82.24
  text "X" at 11462.02,980.86 h60
  text "EDGE COUPLED MICROSTRIP" at 4033.7,980.4 h82.24
  text "5" at 7231.18,977.81 h82.24
  text "90" at 9698.44,977.81 h82.24
  text "02" at 3746.76,971.5 h82.24
  text "LAYER 2 & 3 (INNER LAYERS) XX MIL WIDE, XX MIL SPACE / TRACES REQUIRE 100 OHM DIFFERENTIAL IMPEDANCE" at 11584.52,899.78 h60
  text "L02,L07" at 10662.95,840.17 h82.24
  text "EDGE COUPLED MICROSTRIP" at 4033.7,836.99 h82.24
  text "L1,L8" at 6083.27,837.06 h82.24
  text "5.1" at 7231.18,833.89 h82.24
  text "100" at 9698.44,833.89 h82.24
  text "8.6" at 8482.68,831.82 h82.24
  text "03" at 3746.76,827.58 h82.24
  text "L03" at 10662.95,696.25 h82.24
  text "EDGE COUPLED MICROSTRIP" at 4033.7,693.06 h82.24
  text "L1" at 6083.27,693.14 h82.24
  text "5.2" at 7231.18,689.96 h82.24
  text "120" at 9698.44,689.96 h82.24
  text "7.15" at 8464.64,687.5 h82.24
  text "04" at 3746.76,683.66 h82.24
  text "L02/04,L05/07" at 10394.06,559.08 h82.24
  text "STRIPLINE" at 4029.49,554.53 h82.24
  text "L3,L6" at 6086.6,553 h82.24
  text "5.947" at 7231.18,545.16 h82.24
  text "---" at 8485.37,545.16 h82.24
  text "50" at 9698.44,545.16 h82.24
  text "05" at 3746.76,539.73 h82.24
  text "100" at 9655.71,413.87 h82.24
  text "L3" at 6085.27,409.43 h82.24
  text "L02/04" at 10530.07,401.67 h82.24
  text "06" at 3756.63,399.12 h82.24
  text "EDGE COUPLED STRIPLINE" at 4056.33,399.12 h82.24
  text "4.8" at 7234.8,398.33 h82.24
  text "11.2" at 8528.4,394.58 h82.24
  text "PROJECT TITLE:" at 11343.5,277.5 h45
  text "50" at 9664.81,268.27 h82.24
  text "L1" at 6091.82,265.38 h82.24
  text "L03" at 10674.84,263.63 h82.24
  text "5" at 8552.45,262.3 h82.24
  text "COPLANAR" at 4095.42,249.27 h82.24
  text "12" at 7240.78,248.77 h82.24
  text "07" at 3746.86,242.75 h82.24
  text ".PRJ_Title" at 11393.5,144.17 h70
  text "DESIGNED FOR:" at 11343.5,-23.5 h45
  text ".PRJ_Customer" at 11393.5,-163.5 h70
  text "D" at -416.5,-231.5 h70
  text "D" at 14383.5,-231.5 h70
  text "FILE NAME:" at 11343.5,-323.5 h45
  text ".PCB_File_Name_No_Path" at 11393.5,-443.5 h70
  text "Texas Instruments (TI) and/or its licensors do not warrant the accuracy or completeness of this specification" at 6374,-605.34 h45
  text "ENGINEER:" at 11343.5,-613.5 h45
  text "LAYOUT BY:" at 12848.5,-613.5 h45
  text "or any information contained therein. TI and/or its licensors do not warrant that this design will meet" at 6329.01,-718 h45
  text ".PRJ_Engineer" at 11393.5,-768.49 h70
  text ".PCB_Layout" at 12899,-768.49 h70
  text "the specifications, will be suitable for your application or fit for any particular purpose, or will operate in" at 6329.01,-830.67 h45
  text ".Layer_Name" at 577,-858.49 h60
  text "ALTIUM DESIGNER VERSION:" at 12848.5,-923.5 h45
  text "an implementation. TI and/or its licensors do not warrant that the design is production worthy. You should" at 6329.01,-943.33 h45
  text "completely validate and test your design implementation to confirm the system functionality for your application." at 6374,-1056 h45
  text ".print_Scale" at 11393.5,-1056.83 h70
  text ".Application_BuildNumber" at 12899,-1056.83 h70
  text "1" at 739.84,-1263.5 h70
  text "2" at 3235.5,-1263.5 h70
  text "3" at 5724.84,-1263.5 h70
  text "4" at 8231.51,-1263.5 h70
  text "5" at 10730.5,-1263.5 h70
  text "6" at 13235.5,-1263.5 h70
M11 Gerber Information:
  lines w10: -288.5,-917.67 6311.5,-917.67 ; -288.5,-714.33 6313.5,-714.33 ; -288.5,-511 -288.5,-1121 3716.5,-1121 6313.5,-1121 6313.5,-511 -288,-511 -288,-1121 1287.5,-1121 ; 2176.5,-1121 2176.5,-511 ; 3443.5,-714.33 3443.5,-511 ; 4283.5,-714.33 4283.5,-511 ; 4905.5,-1127.5 4905.5,-924.67
  text "ALL ARTWORK VIEWED FROM TOP SIDE" at -228.5,-655.67 h60
  text "BOARD #:" at 2248,-655.67 h60
  text ".PRJ_Number" at 2793.5,-655.67 h60
  text "REV:" at 3638,-655.67 h60
  text ".PCB_Rev" at 3929.5,-655.67 h60
  text "SVN REV:" at 4476,-655.67 h60
  text ".VersionControl_RevNumber" at 4982,-655.67 h60
  text "LAYER NAME =" at -228.5,-858.49 h60
  text "TID #:" at 2248,-859 h60
  text ".TID" at 2793.5,-859 h60
  text "PLOT NAME =" at -228.5,-1064.34 h60
  text ".plot_File_Name" at 577,-1064.34 h60
  text "GENERATED    :" at 2250,-1064.34 h60
  text ".Print_Date" at 3119.5,-1064.34 h60
  text ".Print_Time" at 3848.5,-1064.34 h60
  text "TEXAS INSTRUMENTS" at 5113,-1064.34 h60
M12 Stackup:
  drawing of 607 lines, arcs and shapes, not listed
  text "Layer" at -154.44,1763.05 h49.01
  text "Name" at 184.03,1763.05 h49.01
  text "Material" at 947.09,1763.05 h49.01
  text "Thickness" at 1653,1763.05 h49.01
  text "Constant" at 2187.44,1763.05 h49.01
  text "Board Layer Stack" at 2656.55,1763.05 h49.01
  text "1" at -154.44,1665.03 h49.01
  text "Top Overlay" at 184.03,1665.03 h49.01
  text "2" at -154.44,1567.02 h49.01
  text "Top Solder" at 184.03,1567.02 h49.01
  text "Solder Resist" at 947.09,1567.02 h49.01
  text "2.00mil" at 1653,1567.02 h49.01
  text "3.9" at 2187.44,1567.02 h49.01
  text "3" at -154.44,1469 h49.01
  text "Top Layer" at 184.03,1469 h49.01
  text "Copper" at 947.09,1469 h49.01
  text "2.76mil" at 1653,1469 h49.01
  text "4" at -154.44,1370.99 h49.01
  text "Dielectric1" at 184.03,1370.99 h49.01
  text "PP-006" at 947.09,1370.99 h49.01
  text "1.68mil" at 1653,1370.99 h49.01
  text "3.79" at 2187.44,1370.99 h49.01
  text "5" at -154.44,1272.98 h49.01
  text "Dielectric 1" at 184.03,1272.98 h49.01
  text "PP-006" at 947.09,1272.98 h49.01
  text "2.56mil" at 1653,1272.98 h49.01
  text "3.86" at 2187.44,1272.98 h49.01
  text "6" at -154.44,1174.96 h49.01
  text "GND1" at 184.03,1174.96 h49.01
  text "Copper" at 947.09,1174.96 h49.01
  text "2.64mil" at 1653,1174.96 h49.01
  text "7" at -154.44,1076.95 h49.01
  text "Dielectric3" at 184.03,1076.95 h49.01
  text "Core-009" at 947.09,1076.95 h49.01
  text "12.00mil" at 1653,1076.95 h49.01
  text "4.47" at 2187.44,1076.95 h49.01
  text "8" at -154.44,978.94 h49.01
  text "Sig1" at 184.03,978.94 h49.01
  text "Copper" at 947.09,978.94 h49.01
  text "2.64mil" at 1653,978.94 h49.01
  text "9" at -154.44,880.92 h49.01
  text "Dielectric2" at 184.03,880.92 h49.01
  text "PP-006" at 947.09,880.92 h49.01
  text "2.70mil" at 1653,880.92 h49.01
  text "4.13" at 2187.44,880.92 h49.01
  text "10" at -154.44,782.91 h49.01
  text "Dielectric 3" at 184.03,782.91 h49.01
  text "PP-006" at 947.09,782.91 h49.01
  text "2.70mil" at 1653,782.91 h49.01
  text "4.13" at 2187.44,782.91 h49.01
  text "11" at -154.44,684.89 h49.01
  text "PWR1" at 184.03,684.89 h49.01
  text "Copper" at 947.09,684.89 h49.01
  text "2.64mil" at 1653,684.89 h49.01
  text "12" at -154.44,586.88 h49.01
  text "Dielectric4" at 184.03,586.88 h49.01
  text "Core-009" at 947.09,586.88 h49.01
  text "5.00mil" at 1653,586.88 h49.01
  text "4.21" at 2187.44,586.88 h49.01
  text "13" at -154.44,488.87 h49.01
  text "PWR2" at 184.03,488.87 h49.01
  text "Copper" at 947.09,488.87 h49.01
  text "2.64mil" at 1653,488.87 h49.01
  text "14" at -154.44,390.85 h49.01
  text "Dielectric5" at 184.03,390.85 h49.01
  text "PP-006" at 947.09,390.85 h49.01
  text "2.70mil" at 1653,390.85 h49.01
  text "4.13" at 2187.44,390.85 h49.01
  text "15" at -154.44,292.84 h49.01
  text "Dielectric 4" at 184.03,292.84 h49.01
  text "PP-006" at 947.09,292.84 h49.01
  text "2.70mil" at 1653,292.84 h49.01
  text "4.13" at 2187.44,292.84 h49.01
  text "16" at -154.44,194.83 h49.01
  text "Sig2" at 184.03,194.83 h49.01
  text "Copper" at 947.09,194.83 h49.01
  text "2.64mil" at 1653,194.83 h49.01
  text "17" at -154.44,96.81 h49.01
  text "Dielectric8" at 184.03,96.81 h49.01
  text "Core-009" at 947.09,96.81 h49.01
  text "12.00mil" at 1653,96.81 h49.01
  text "4.47" at 2187.44,96.81 h49.01
  text "18" at -154.44,-1.2 h49.01
  text "GND2" at 184.03,-1.2 h49.01
  text "Copper" at 947.09,-1.2 h49.01
  text "2.64mil" at 1653,-1.2 h49.01
  text "19" at -154.44,-99.22 h49.01
  text "Dielectric9" at 184.03,-99.22 h49.01
  text "PP-006" at 947.09,-99.22 h49.01
  text "2.56mil" at 1653,-99.22 h49.01
  text "3.86" at 2187.44,-99.22 h49.01
  text "20" at -154.44,-197.23 h49.01
  text "Dielectric 2" at 184.03,-197.23 h49.01
  text "PP-006" at 947.09,-197.23 h49.01
  text "1.68mil" at 1653,-197.23 h49.01
  text "3.79" at 2187.44,-197.23 h49.01
  text "21" at -154.44,-295.24 h49.01
  text "Bottom Layer" at 184.03,-295.24 h49.01
  text "Copper" at 947.09,-295.24 h49.01
  text "2.76mil" at 1653,-295.24 h49.01
  text "22" at -154.44,-393.26 h49.01
  text "Bottom Solder" at 184.03,-393.26 h49.01
  text "Solder Resist" at 947.09,-393.26 h49.01
  text "2.00mil" at 1653,-393.26 h49.01
  text "3.9" at 2187.44,-393.26 h49.01
  text "23" at -154.44,-491.27 h49.01
  text "Bottom Overlay" at 184.03,-491.27 h49.01
  text ".Layer_Name" at 577,-858.49 h60
M13 Component Bodies Top:
  text ".Layer_Name" at 577,-858.49 h60
M14 Component Bodies Bottom:
  text ".Layer_Name" at 577,-858.49 h60
M15 Courtyards Top:
  text ".Layer_Name" at 577,-858.49 h60
M16 Courtyards Bottom:
  text ".Layer_Name" at 577,-858.49 h60
Drill Drawing:
  drawing of 183 lines, arcs and shapes, not listed
  text "Symbol" at -171.23,7847.68 h72
  text "Count" at 334.65,7847.68 h72
  text "Hole Size" at 924.49,7847.68 h72
  text "Plated" at 2074.15,7847.68 h72
  text "Hole Tolerance (+)" at 2580.03,7847.68 h72
  text "Hole Tolerance (-)" at 3913.64,7847.68 h72
  text "35" at 334.65,7697.68 h60
  text "7.87mil (0.200mm)" at 924.49,7697.68 h60
  text "PTH" at 2074.15,7697.68 h60
  text "752" at 334.65,7547.68 h60
  text "8.00mil (0.203mm)" at 924.49,7547.68 h60
  text "PTH" at 2074.15,7547.68 h60
  text "53" at 334.65,7397.68 h60
  text "8.00mil (0.203mm)" at 924.49,7397.68 h60
  text "PTH" at 2074.15,7397.68 h60
  text "3.00mil (0.076mm)" at 2580.03,7397.68 h60
  text "3.00mil (0.076mm)" at 3913.64,7397.68 h60
  text "3" at 334.65,7247.68 h60
  text "10.00mil (0.254mm)" at 924.49,7247.68 h60
  text "PTH" at 2074.15,7247.68 h60
  text "3.00mil (0.076mm)" at 2580.03,7247.68 h60
  text "3.00mil (0.076mm)" at 3913.64,7247.68 h60
  text "10" at 334.65,7097.68 h60
  text "23.62mil (0.600mm)" at 924.49,7097.68 h60
  text "PTH" at 2074.15,7097.68 h60
  text "2" at 334.65,6947.68 h60
  text "23.62mil (0.600mm)" at 924.49,6947.68 h60
  text "PTH" at 2074.15,6947.68 h60
  text "10" at 334.65,6797.68 h60
  text "27.56mil (0.700mm)" at 924.49,6797.68 h60
  text "PTH" at 2074.15,6797.68 h60
  text "3" at 334.65,6647.68 h60
  text "31.50mil (0.800mm)" at 924.49,6647.68 h60
  text "PTH" at 2074.15,6647.68 h60
  text "3.94mil (0.100mm)" at 2580.03,6647.68 h60
  text "3.94mil (0.100mm)" at 3913.64,6647.68 h60
  text "A" at -200.32,6637.69 h66.67
  text "2" at 334.65,6497.68 h60
  text "31.50mil (0.800mm)" at 924.49,6497.68 h60
  text "PTH" at 2074.15,6497.68 h60
  text "3.94mil (0.100mm)" at 2580.03,6497.68 h60
  text "3.94mil (0.100mm)" at 3913.64,6497.68 h60
  text "2" at 334.65,6347.68 h60
  text "33.47mil (0.850mm)" at 924.49,6347.68 h60
  text "PTH" at 2074.15,6347.68 h60
  text "1" at 334.65,6197.68 h60
  text "40.00mil (1.016mm)" at 924.49,6197.68 h60
  text "PTH" at 2074.15,6197.68 h60
  text "1" at 334.65,6047.68 h60
  text "64.96mil (1.650mm)" at 924.49,6047.68 h60
  text "PTH" at 2074.15,6047.68 h60
  text "55" at 334.65,5897.68 h60
  text "24.00mil (0.610mm)" at 924.49,5897.68 h60
  text "NPTH" at 2074.15,5897.68 h60
  text "3.00mil (0.076mm)" at 2580.03,5897.68 h60
  text "3.00mil (0.076mm)" at 3913.64,5897.68 h60
  text "4" at 334.65,5747.68 h60
  text "40.16mil (1.020mm)" at 924.49,5747.68 h60
  text "NPTH" at 2074.15,5747.68 h60
  text "6" at 334.65,5597.68 h60
  text "88.00mil (2.235mm)" at 924.49,5597.68 h60
  text "NPTH" at 2074.15,5597.68 h60
  text "3.00mil (0.076mm)" at 2580.03,5597.68 h60
  text "3.00mil (0.076mm)" at 3913.64,5597.68 h60
  text "2" at 334.65,5447.68 h60
  text "100.00mil (2.540mm)" at 924.49,5447.68 h60
  text "NPTH" at 2074.15,5447.68 h60
  text "3.00mil (0.076mm)" at 2580.03,5447.68 h60
  text "3.00mil (0.076mm)" at 3913.64,5447.68 h60
  text "941 Total" at 334.65,5297.68 h60
  text "Slot definitions :" at -171.23,5152.71 h60
  text "Routed Path Length" at 861.46,5152.71 h60
  text "= Calculated from tool start centre position to tool end centre position." at 1964.13,5152.71 h60
  text "Hole Length" at 861.46,5052.73 h60
  text "= Routed Path Length + Tool Size = Slot length as defined in the PCB layout" at 1554.26,5052.73 h60
  text ".Layer_Name" at 577,-858.49 h60
M17 Embedded Cavity:
  text ".Layer_Name" at 577,-858.49 h60
M18 Embedded Assembly:
  text ".Layer_Name" at 577,-858.49 h60
M19 Embedded Keepout:
  text ".Layer_Name" at 577,-858.49 h60
Mechanical 21:
  drawing of 1383 lines, arcs and shapes, not listed